# Altium PCB ESP8266_SENSOR_PCB_2.PcbDoc
Units mm, origin at the board's own origin, x right, y up, seen from the top; angles counter-clockwise.
Board outline 19.32 x 52.81 mm, 2 copper layers (Top Layer, Bottom Layer); 26 components, 18 nets, 88 pads, 70 vias.
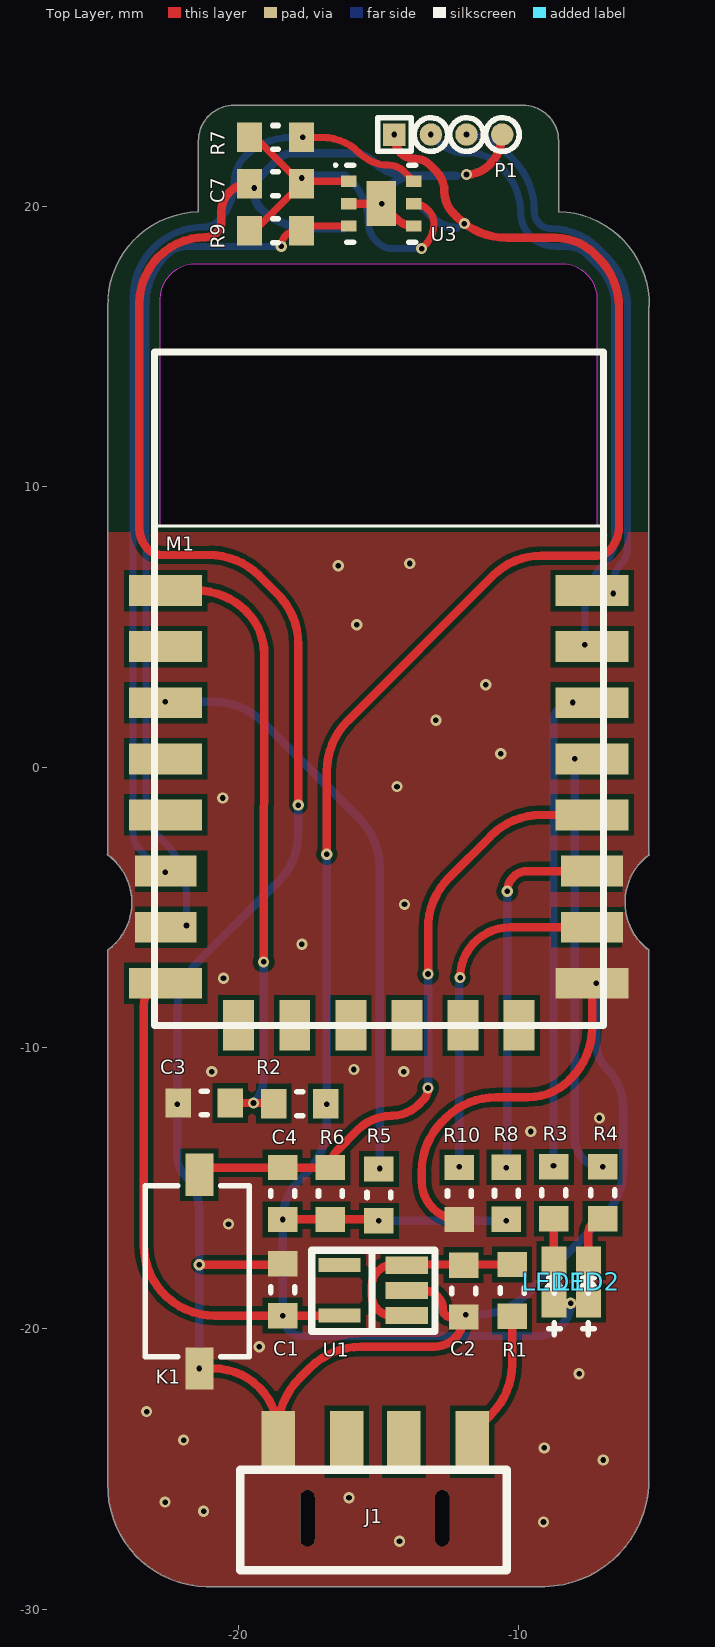
[diagram p0: Top Layer view]
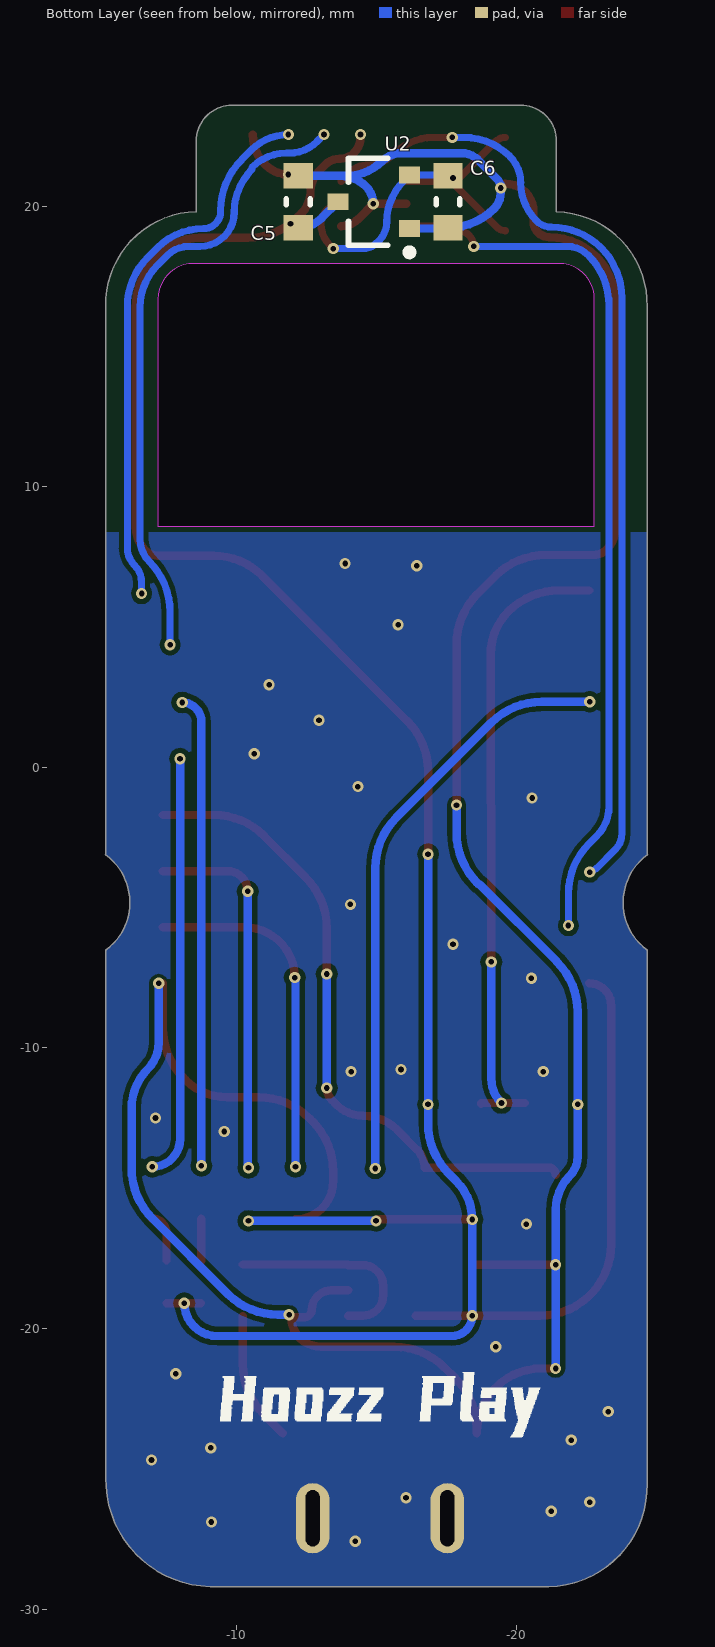
[diagram p1: Bottom Layer view, seen from below]

## Layer stack, top to bottom
Top Solder: solder mask 0.0102, Solder Resist, Dk 3.5
Top Layer: signal copper 0.0356
Dielectric 1: dielectric 0.32, FR-4, Dk 4.8
Bottom Layer: signal copper 0.0356
Bottom Solder: solder mask 0.0102, Solder Resist, Dk 3.5

## Board outline
-24.647,-25.533 -24.647,-6.504 -24.637,-6.504 ccw(c-25.9,-4.818) -24.664,-3.112 -24.647,-3.112 -24.647,16.421 cw(c-21.343,16.495) -21.418,19.8 -21.418,19.806 -21.418,22.327 cw(c-20.148,22.327) -20.148,23.597 -9.85,23.597 cw(c-9.85,22.327) -8.58,22.327 -8.58,19.806 -8.579,19.806 cw(c-8.654,16.503) -5.351,16.428 -5.359,16.428 -5.359,-3.112 -5.342,-3.112 ccw(c-4.107,-4.818) -5.369,-6.504 -5.359,-6.504 -5.359,-25.314 -5.36,-25.314 cw(c-9.16,-25.4) -9.074,-29.2 -9.074,-29.21 -21.133,-29.21 cw(c-21.051,-25.614)
cut-out: -22.771,8.585 -22.771,16.688 cw(c-21.501,16.688) -21.501,17.958 -8.484,17.958 cw(c-8.484,16.688) -7.214,16.688 -7.214,8.585

## Design rules (kind name [scope] priority, off if disabled: settings)
Clearance [All] p1: gap=0.18 ignorepadtopadclearanceinfootprint=FALSE
PlaneConnect [All] p1: planeconnectstyle=Direct reliefexpansion=0.508 reliefentries=4 reliefconductorwidth=0.254 reliefairgap=0.254
PolygonConnect [All] p1: connectstyle=Direct reliefconductorwidth=0.254 reliefentries=4 polygonreliefangle="90 Angle" airgapwidth=0.254
RoutingVias [All] p1: holewidth=0.711 width=1.27 viastyle="Through Hole" minholewidth=0.711 minwidth=1.27 maxholewidth=0.711 maxwidth=1.27
SolderMaskExpansion [All] p1: expansion=0.102
Width [All] p1: maxlimit=2 minlimit=0.254 preferedwidth=0.254
29 further rules are at their usual default settings.

## Components (designator, comment, footprint, x,y, rotation, side; value= is the part's Value field where it differs from the comment)
C1 "Cap" 0603 -18.415,-18.618 r270 top value=1uF
C2 "Cap" 0603 -11.963,-18.669 r90 top value=1uF
C3 "Cap" 0603 -21.209,-11.963 r180 top value=100pF
C4 "Cap" 0603 -18.415,-15.189 r90 top value=100nF
C5 "Cap" 0603 -12.217,20.157 r270 bottom value=1uF
C6 "Cap" 0603 -17.551,20.157 r90 bottom value=1uF
C7 "Cap" 0603 -18.669,20.803 r0 top value=100nF
J1 "USBA" USB-A-2 -15.155,-26.314 r180 top
K1 "BUTTON" BUTTON -21.387,-17.958 r270 top
LED1 "LED" LED0603 -8.738,-18.341 r270 top
LED2 "LED" LED0603 -7.518,-18.339 r270 top
M1 "ESP-12E&F Module" "ESP-12E&F Module" -14.986,-1.448 r0 top
P1 "TEST-PORT-4P" TEST_PORT_4P -14.457,22.555 r90 top
R1 "Res" 0603 -10.236,-18.644 r90 top value=3R3
R2 "Res" 0603 -17.805,-11.989 r0 top value=10K
R3 "Res" 0603 -8.75,-15.164 r90 top value=1K
R4 "Res" 0603 -7.01,-15.164 r90 top value=3K
R5 "Res" 0603 -14.986,-15.24 r90 top value=10K
R6 "Res" 0603 -16.713,-15.189 r270 top value=10K
R7 "Res" 0603 -18.669,22.454 r0 top value=4.7K
R8 "Res" 0603 -10.439,-15.179 r270 top value=10K
R9 "Res" 0603 -18.669,19.126 r0 top value=4.7K
R10 "Res" 0603 -12.116,-15.189 r90 top value=10K
U1 "ME6211-3.3" SOT-23-5 -15.192,-18.644 r90 top
U2 "ME6211A18M3G-N" SOT-23-3 -14.905,20.157 r0 bottom
U3 "SGP30" SGP30 -14.904,20.091 r0 top

## Footprints (in the part's own frame and the unit in brackets; to place one, negate y for a bottom-side part, rotate by r counter-clockwise, add the part's x,y. Pads: shape width x height; smd on the part's side, far side on the other; paste and mask are expansions set on the pad)
0603 [mm] "2-Leads, Body 2.00x1.00mm, IPC Medium Density"
  rect 0.9x1.05 smd: 1(-0.925,0) 2(0.925,0)
  silkscreen extent -0.1,-0.43 0.1,0.43, body extent -1,-0.5 1,0.5, height 0.6
BUTTON [mm]
  rect 1.5x1 smd: 1(-3.437,0) 2(3.47,0)
  silkscreen extent -3.05,-1.92 3.05,1.78, body extent -3.05,-1.92 3.05,1.78, height 2
"ESP-12E&F Module" [mm]
  rect 2.6x1.1 smd: 1(-7.6,7.75) 2(-7.6,5.75) 3(-7.6,3.75) 4(-7.6,1.75) 5(-7.6,-0.25) 8(-7.6,-6.25) 15(7.6,-6.25) 18(7.6,-0.25) 19(7.6,1.75) 20(7.6,3.75) 21(7.6,5.75) 22(7.6,7.75)
  rect 2.2x1.1 smd: 6(-7.6,-2.25) 7(-7.6,-4.25) 16(7.6,-4.25) 17(7.6,-2.25)
  rect 1.1x1.8 smd: 9(-5,-7.75) 10(-3,-7.75) 11(-1,-7.75) 12(1,-7.75) 13(3,-7.75) 14(5,-7.75)
  silkscreen extent -8,-7.75 8,16.25
LED0603 [mil]
  rect 40x35 smd: 1(29.92,0) 2(-29.92,0)
  silkscreen extent -12,-10 74,10, body extent -34,-17 37,16, height 20
SGP30 [mm] "6-Leads, Body 2.45x2.45mm"
  rect 0.55x0.4 smd: 1(-1.16,0.8) 2(-1.16,0) 3(-1.16,-0.8) 4(1.16,-0.8) 5(1.16,0) 6(1.16,0.8)
  rect 1.05x1.6 smd: 7(0,0)
  silkscreen extent -1.67,-1.37 1.22,1.42, body extent -1.23,-1.22 1.22,1.23, height 0.9
SOT-23-3 [mm] "SOT23, 3-Leads, Body 2.90x2.80mm, Pitch 0.95mm, IPC High Density"
  rect 0.75x0.6 smd: 1(-1.275,0.95) 2(-1.275,-0.95) 3(1.275,0)
  silkscreen extent -1.4,-1.55 0.9,1.92, body extent -0.9,-1.55 0.9,1.55, height 1.1
SOT-23-5 [mm]
  rect 0.6x1.5 smd: 1(-0.9,-1.2) 2(0,-1.2)
  rect 0.63x1.5 smd: 3(0.9,-1.2)
  rect 0.5x1.5 smd: 4(0.9,1.2) 5(-0.9,1.2)
  silkscreen extent -1.47,-2.21 1.43,2.18, body extent -1.38,-0.95 1.3,0.9, height 1
TEST_PORT_4P [mm] "Test port"
  rect 0.8x0.8 smd: 1(0,-0.025)
  round 0.8 smd: 2(0,-1.325) 2(0,-1.325) 3(0,-2.595) 4(0,-3.865)
  silkscreen extent -0.6,-4.47 0.6,0.58
USB-A-2 [mm]
  rect 1.2x2.2 smd: 1(-3.5,-2.275) 2(-1.06,-2.275) 3(0.98,-2.275) 4(3.42,-2.275)
  oval 0.5x2 / inner oval 1.2x2.5 / far side oval 1.2x2.5 hole 0.5 slot 2 at 90 deg: ""(-2.425,0.45) ""(2.375,0.45)
  silkscreen extent -4.72,-1.27 4.78,2.3

## Part data
C1 C2 C3 C4 C5 C6 C7: "Capacitor", LatestRevisionDate=17-Jul-2002, LatestRevisionNote="Re-released for DXP Platform.", PackageDescription="Radial Cap, Thru-Hole; 2 Leads; 0.3 in Pin Spacing", PackageReference=RAD-0.3, Published=8-Jun-2000, Publisher="Altium Limited"
J1: "USB2.0"
R1 R2 R3 R4 R5 R6 R7 R8 R9 R10: "Resistor", LatestRevisionDate=29-May-2009, LatestRevisionNote="IPC-7351 Footprint Added.", PackageDescription="Chip Resistor", PackageReference=J1-0603, Published=8-Jun-2000, Publisher="Altium Limited"
U1: "No Description Available", Manufacturer="Texas Instruments", Manufacturer_Part_Number=REG102NA-2.5/250, Built_By=EMA_UL_Team, Copyright="Copyright (C) 2018 Accelerated Designs. All rights reserved", RefDes=RefDes, SourceLibrary=TI_2016-07-06, Type=DEV, Vendor="Texas Instruments"
U2: "High Speed LDO Regulators,High PSRR,Low noise, Output 1.8V"
U3: "Indoor Air Quality Sensor for TVOC and CO2 eq Measurements"

## Via types
v1: diameter 0.4/0.4 (per signal layer), hole 0.2, Top Layer to Bottom Layer, 68 vias
v2: diameter 0.5/0.4 (per signal layer), hole 0.2, Top Layer to Bottom Layer, 2 vias

## Nets (pads, with @x,y where several pads share a name; then routed paths per layer and width w, separated by ;. In a path a pad name is that pad's centre, name@x,y a point inside that pad or via, vN(x,y) a via of type N, cw(c..) or ccw(c..) an arc to the next point about the centre after c; other vN are vias at no path point)
GND: C1.1 C2.1 C3.2 C5.1 C6.1 C7.1 J1. J1.4 K1.2 M1.15 P1.4 R10.1 U1.2 U2.1 U3.2 U3.4 U3.7 | length 115.2
  Top Layer w0.3: v1(-21.387,-21.428) -20.881,-21.428 cw(c-20.881,-23.735) -18.575,-23.735 -18.575,-23.589 cw(c-16.035,-23.589) -17.831,-21.793 -17.432,-21.394 cw(c-15.636,-23.19) -15.636,-20.65 -13.02,-20.65 ccw(c-13.02,-19.594) C2.1 -12.435,-19.594 cw(c-12.435,-19.329) -12.7,-19.329 ccw(c-13.386,-19.329) -13.386,-18.644 U1.2 ; v1@-21.336,-17.729 -18.451,-17.729 ccw(c-18.451,-17.693) C1.1 ; C7.1 ccw(c-19.594,19.797) -20.599,19.797 -20.599,19.456 cw(c-21.158,19.456) -21.158,18.898 ccw(c-21.158,16.535) -23.52,16.535 -23.52,8.508 ccw(c-22.48,8.508) -23.216,7.772 ccw(c-22.725,8.263) -22.725,7.569 -21.042,7.569 cw(c-21.042,5.029) -19.246,6.825 -18.6,6.18 cw(c-20.396,4.383) -17.856,4.383 v1(-17.856,-1.346) ; U3.2 U3.7 -14.359,19.546 ccw(c-13.744,20.161) U3.4 ; R10.1 cw(c-12.116,-14.791) -13.052,-15.727 cw(c-12.061,-14.736) -13.462,-14.736 -13.462,-14.402 cw(c-10.947,-14.402) -12.725,-12.624 -12.606,-12.504 cw(c-10.81,-14.3) -10.81,-11.76 -9.676,-11.76 ccw(c-9.676,-9.679) -8.204,-11.151 -8.13,-11.076 ccw(c-9.926,-9.28) -7.386,-9.28 M1.15 ; v1(-11.862,21.133) ccw(c-11.862,22.28) -11.05,21.469 -11.036,21.484 ccw(c-12.107,22.555) P1.4
  Bottom Layer w0.3: v1(-21.387,-21.428) v1(-21.387,-17.729) -21.387,-15.781 ccw(c-23.121,-15.781) -21.895,-14.554 cw(c-21.22,-13.88) -22.174,-13.88 v1(-22.174,-12.014) -22.174,-8.723 cw(c-19.634,-8.723) -21.43,-6.927 -18.687,-4.184 cw(c-18.644,-4.227) -18.644,-4.166 -18.6,-4.122 ccw(c-20.396,-2.326) -17.856,-2.326 v1(-17.856,-1.346) ; C6.1 cw(c-17.551,21.555) -19.194,19.913 cw(c-18.622,20.485) -19.431,20.485 v1(-19.431,20.65) cw(c-18.971,20.65) -19.296,20.975 -18.618,21.653 cw(c-18.035,21.071) -18.035,21.895 -15.889,21.895 cw(c-15.889,20.941) -15.215,21.615 ccw(c-13.928,22.902) -13.928,21.082 -13.706,21.082 ; C6.1@-17.491,19.207 U2.1 ; v1(-14.884,20.091) cw(c-14.026,20.091) -14.633,20.698 cw(c-13.706,19.771) -13.706,21.082 ; C5.1 -13.706,21.082 ; v1(-11.887,-19.507) -11.492,-19.507 ccw(c-11.492,-16.967) -9.695,-18.763 -7.018,-16.086 ccw(c-8.814,-14.289) -6.274,-14.289 -6.274,-12.155 ccw(c-8.268,-12.155) -6.858,-10.744 cw(c-5.938,-9.824) -7.239,-9.824 v1(-7.239,-7.696)
  other v1: -14.249,-27.584 -9.119,-26.899 -21.234,-26.518 -22.606,-26.187 -16.053,-26.035 -6.985,-24.689 -9.093,-24.257 -21.946,-23.978 -23.266,-22.962 -7.849,-21.615 -19.253,-20.65 -20.345,-16.281 -9.576,-12.979 -7.125,-12.497 -20.946,-10.846 -14.097,-10.846 -15.875,-10.77 -20.523,-7.518 -17.729,-6.309 -14.072,-4.885 -20.549,-1.092 -14.341,-0.686 -10.643,0.483 -12.954,1.676 -11.176,2.946 -15.773,5.08 -16.434,7.188 -13.885,7.264
I2C_SCL: M1.6 R7.2 U3.6 | length 34.8
  Top Layer w0.254: R7.2 -17.021,22.454 cw(c-17.021,20.546) -15.672,21.895 ccw(c-14.629,22.937) -14.629,21.463 cw(c-14.629,20.707) -14.095,21.242 U3.6
  Bottom Layer w0.254: v1@-22.555,-3.708 cw(c-22.555,-3.279) -22.859,-3.583 -23.516,-2.926 cw(c-22.952,-2.362) -23.749,-2.362 -23.749,16.728 cw(c-21.209,16.728) -23.005,18.524 cw(c-21.244,16.763) -21.244,19.253 ccw(c-21.244,20.013) -20.707,19.476 ccw(c-22.07,20.839) -20.142,20.839 cw(c-18.82,20.839) -19.755,21.774 cw(c-18.114,20.133) -18.114,22.454 v1(-17.704,22.454)
  other v1: -22.606,-3.734
I2C_SDA: M1.7 R9.2 U3.3 | length 31.5
  Top Layer w0.254: v1(-18.466,18.567) cw(c-17.907,18.567) -17.907,19.126 R9.2 -17.579,19.291 U3.3
  Bottom Layer w0.254: v1(-21.844,-5.639) -21.844,-4.507 ccw(c-24.384,-4.507) -22.588,-2.71 -22.861,-2.438 cw(c-21.82,-1.397) -23.292,-1.397 -23.292,16.461 cw(c-20.752,16.461) -22.548,18.258 cw(c-21.8,17.51) -21.8,18.567 v1(-18.466,18.567)
NetC2_2: C2.2 R1.2 U1.1 U1.3 | length 7.4
  Top Layer w0.3: U1.1 -14.518,-19.544 cw(c-14.518,-18.821) -15.24,-18.821 -15.24,-18.466 cw(c-14.518,-18.466) -14.518,-17.744 U1.3 cw(c-13.967,-17.744) -13.967,-17.719 R1.2
NetC3_1: C3.1 M1.1 R2.1 | length 22.7
  Top Layer w0.3: M1.1 -21.502,6.302 cw(c-21.502,3.762) -19.706,5.558 cw(c-21.229,4.036) -19.075,4.036 ; C3.1 v1(-19.456,-11.963) -18.756,-11.963 cw(c-18.756,-11.989) R2.1 ; v1(-19.093,-6.934) -19.075,4.264
  Bottom Layer w0.3: v1(-19.456,-11.963) ccw(c-20.333,-11.087) -19.093,-11.087 v1(-19.093,-6.934)
NetC4_2: C4.2 K1.1 M1.18 R6.1 | length 23.3
  Top Layer w0.3: K1.1 cw(c-21.13,-14.521) -21.13,-14.264 C4.2 R6.1 cw(c-15.819,-14.264) -16.451,-13.632 -15.743,-12.923 cw(c-14.529,-14.138) -14.529,-12.421 ccw(c-14.529,-11.072) -13.575,-12.025 -13.413,-11.864 ccw(c-13.847,-11.43) v1(-13.233,-11.43) ; v1(-13.233,-7.366) -13.233,-5.731 cw(c-10.693,-5.731) -12.489,-3.935 -10.996,-2.442 cw(c-9.2,-4.238) -9.2,-1.698 M1.18
  Bottom Layer w0.3: v1(-13.233,-11.43) v1(-13.233,-7.366)
NetJ1_1: J1.1 R1.1 | length 4.6
  Top Layer w0.3: J1.1@-11.655,-23.735 -10.98,-23.06 ccw(c-12.776,-21.264) -10.236,-21.264 R1.1
NetLED1_2: LED1.2 R3.1 | length 1.5
  Top Layer w0.3: R3.1 -8.75,-17.581 LED1.2
NetLED2_2: LED2.2 R4.1 | length 1.8
  Top Layer w0.3: LED2.2 -7.518,-16.597 cw(c-7.01,-16.597) R4.1
NetM1_3: M1.3 R5.2 | length 21.2
  Bottom Layer w0.3: v1(-22.606,2.337) -20.89,2.337 cw(c-20.89,-0.203) -19.093,1.593 -15.705,-1.796 cw(c-17.501,-3.592) -14.961,-3.592 v1(-14.961,-14.3)
NetM1_16: M1.16 R10.2 | length 12.5
  Top Layer w0.3: v1(-12.09,-7.493) cw(c-10.295,-7.493) -10.295,-5.698 M1.16
  Bottom Layer w0.3: v1(-12.116,-14.239) v1@-12.116,-7.493
NetM1_17: M1.17 R8.1 | length 13.3
  Top Layer w0.3: v1(-10.414,-4.42) cw(c-9.692,-4.42) -9.692,-3.698 M1.17
  Bottom Layer w0.3: v1(-10.439,-14.275) -10.414,-14.249 v1(-10.414,-4.42)
NetM1_19: M1.19 R4.2 | length 15.1
  Bottom Layer w0.3: v1(-8.001,0.305) -8.001,-13.248 ccw(c-7.01,-13.248) v1(-7.01,-14.239)
NetM1_20: M1.20 R3.2 | length 16.9
  Bottom Layer w0.3: v1(-8.763,-14.199) -8.763,1.626 cw(c-8.077,1.626) v1(-8.077,2.311)
UART_RX: M1.21 P1.2 | length 22.2
  Bottom Layer w0.254: v1(-13.132,22.555) -12.872,22.295 ccw(c-11.905,23.261) -11.905,21.895 -11.793,21.895 cw(c-11.793,20.16) -10.566,21.387 ; -10.56,21.304 cw(c-12.078,19.787) -9.931,19.787 ccw(c-8.712,19.787) -8.712,18.567 -8.306,18.567 cw(c-8.306,17.503) -7.553,18.256 -7.196,17.899 cw(c-8.688,16.408) -6.579,16.408 -6.579,8.116 cw(c-7.681,8.116) -6.901,7.337 ccw(c-5.105,5.541) -7.645,5.541 v1(-7.645,4.369)
UART_TX: M1.22 P1.3 | length 19.6
  Bottom Layer w0.254: v1(-11.862,22.555) cw(c-11.862,20.703) -10.552,22.013 -10.193,21.653 cw(c-11.989,19.857) -9.449,19.857 -9.449,19.812 ccw(c-8.839,19.812) -8.839,19.202 cw(c-8.839,16.872) -7.192,18.52 -6.865,18.194 cw(c-8.661,16.398) -6.121,16.398 -6.121,7.827 cw(c-6.989,7.827) -6.375,7.214 ccw(c-5.762,6.6) -6.629,6.6 v1(-6.629,6.198)
VDD1V8: C6.2 C7.2 R7.1 R9.1 U2.2 U3.1 U3.5 | length 14.6
  Top Layer w0.254: R9.1 ccw(c-19.594,19.545) R9.1@-19.298,19.249 ; R7.1 cw(c-19.594,21.973) -19.254,22.313 C7.2 ; R9.1@-19.298,19.249 C7.2 ; U3.1 -17.655,20.891 C7.2 ; U3.5 cw(c-13.744,19.409) -13.262,19.892 -13.215,19.844 cw(c-13.678,19.38) -13.022,19.38 cw(c-14.108,19.38) -13.34,18.613 v1(-13.462,18.491)
  Bottom Layer w0.254: C6.2 cw(c-17.491,21.022) -17.491,21.107 U2.2 -15.978,20.905 cw(c-17.452,19.431) -15.367,19.431 ccw(c-14.447,19.431) -15.098,18.781 -15.006,18.689 ccw(c-14.529,19.166) -14.529,18.491 v1(-13.462,18.491)
  other v1: -17.729,21.006
VDD3V3: C1.2 C4.1 C5.2 LED1.1 LED2.1 M1.8 P1.1 R2.2 R5.1 R6.2 R8.2 U1.5 U2.3 | length 94.3
  Top Layer w0.3: M1.8 ccw(c-22.586,-8.48) -23.368,-8.48 -23.368,-17.003 ccw(c-20.828,-17.003) -20.828,-19.543 v1(-18.415,-19.543) ; v1(-18.415,-19.543) U1.5 ; v1(-18.415,-16.114) R6.2 -15.037,-16.114 cw(c-15.037,-16.165) v2(-14.986,-16.165) ; v1(-16.84,-3.099) -16.84,-0.138 cw(c-14.3,-0.138) -16.096,1.658 -10.929,6.825 cw(c-9.195,5.091) -9.195,7.544 -7.211,7.544 ccw(c-7.211,8.151) -6.782,7.722 ccw(c-7.64,8.58) -6.426,8.58 -6.426,16.375 ccw(c-8.966,16.375) -7.17,18.171 -7.295,18.296 ccw(c-8.687,16.904) -8.687,18.872 -10.414,18.872 cw(c-10.414,21.387) -12.192,19.609 -12.326,19.743 cw(c-11.545,20.523) -12.649,20.523 ccw(c-13.692,20.523) -12.955,21.26 -13.17,21.476 ccw(c-13.691,20.956) -13.691,21.692 -13.708,21.692 cw(c-13.708,22.385) -14.199,21.895 cw(c-13.636,22.458) -14.432,22.458 v1(-14.432,22.555) ; LED1.1 -8.738,-19.099 LED2.1
  Bottom Layer w0.3: v1(-16.84,-3.099) v1(-16.84,-12.014) -16.84,-12.689 cw(c-19.38,-12.689) -17.584,-14.485 -17.851,-14.752 ccw(c-16.488,-16.114) v1(-18.415,-16.114) v1(-18.415,-19.543) ccw(c-17.689,-19.543) -17.689,-20.269 -9.322,-20.269 ccw(c-9.322,-19.101) v1(-8.153,-19.101) ; v2(-14.986,-16.165) v2(-10.439,-16.165) ; U2.3 -13.049,19.577 ccw(c-12.217,20.409) C5.2
  other v1: -11.938,19.38
pads on no net: J1.2 J1.3 M1.2 M1.4 M1.5 M1.9 M1.10 M1.11 M1.12 M1.13 M1.14 U1.4

## Polygon pours and split planes (outlines as drawn)
GND on Top Layer "GND_L01_P015" (solid, pour order 15): -24.647,-25.533 -24.647,-6.504 -24.637,-6.504 ccw(c-25.9,-4.818) -24.664,-3.112 -24.647,-3.112 -24.647,16.421 cw(c-21.343,16.495) -21.418,19.8 -21.418,19.806 -21.418,22.327 cw(c-20.148,22.327) -20.148,23.597 -9.85,23.597 cw(c-9.85,22.327) -8.58,22.327 -8.58,19.806 -8.579,19.806 cw(c-8.654,16.503) -5.351,16.428 -5.359,16.428 -5.359,-3.112 -5.342,-3.112 ccw(c-4.107,-4.818) -5.369,-6.504 -5.359,-6.504 -5.359,-25.314 -5.36,-25.314 cw(c-9.16,-25.4) -9.074,-29.2 -9.074,-29.21 -21.133,-29.21 cw(c-21.051,-25.614)
GND on Bottom Layer "GND_L02_P016" (solid, pour order 16): -24.647,-25.533 -24.647,-6.504 -24.637,-6.504 ccw(c-25.9,-4.818) -24.664,-3.112 -24.647,-3.112 -24.647,16.421 cw(c-21.343,16.495) -21.418,19.8 -21.418,19.806 -21.418,22.327 cw(c-20.148,22.327) -20.148,23.597 -9.85,23.597 cw(c-9.85,22.327) -8.58,22.327 -8.58,19.806 -8.579,19.806 cw(c-8.654,16.503) -5.351,16.428 -5.359,16.428 -5.359,-3.112 -5.342,-3.112 ccw(c-4.107,-4.818) -5.369,-6.504 -5.359,-6.504 -5.359,-25.314 -5.36,-25.314 cw(c-9.16,-25.4) -9.074,-29.2 -9.074,-29.21 -21.133,-29.21 cw(c-21.051,-25.614)

## Other copper
Top Layer:
  pour cut-out: -4.547,25.171 -4.547,8.382 -25.527,8.382 -25.527,25.171
Bottom Layer:
  pour cut-out: -4.547,25.171 -4.547,8.382 -25.527,8.382 -25.527,25.171

## Silkscreen, mask and mechanical layers (free items; w line width, h text height)
Top Overlay:
  text ".Layer_Name" at -41.885,22.047 h1
Bottom Overlay:
  drawing of 9 lines, arcs and shapes, not listed
  text ".Layer_Name" at 16.104,22.454 h1
Mechanical 1:
  lines w0.2: -24.664,-3.112 cw(c-25.9,-4.818) -24.637,-6.504 ; -24.647,-6.504 -24.647,-25.533 ccw(c-21.051,-25.614) -21.133,-29.21 -9.074,-29.21 ; -24.647,-3.112 -24.647,16.421 cw(c-21.343,16.495) -21.418,19.8 ; -22.771,8.585 -22.771,14.806 -22.771,16.688 cw(c-21.501,16.688) -21.501,17.958 -8.484,17.958 cw(c-8.484,16.688) -7.214,16.688 -7.214,16.332 -7.214,14.806 -7.214,8.585 -22.758,8.585 ; -21.418,19.806 -21.418,22.327 cw(c-20.148,22.327) -20.148,23.597 -9.85,23.597 cw(c-9.85,22.327) -8.58,22.327 -8.58,19.806 ; -9.074,-29.2 ccw(c-9.16,-25.4) -5.36,-25.314 ; -8.579,19.806 cw(c-8.654,16.503) -5.351,16.428 ; -5.369,-6.504 cw(c-4.107,-4.818) -5.342,-3.112 ; -5.359,-25.314 -5.359,-6.504 ; -5.359,-3.112 -5.359,16.428